# Altium PCB 400390.PcbDoc (part 4 of 5)
Units mm, origin at the board's own origin, x right, y up, seen from the top; angles counter-clockwise.
Board outline 50.8 x 50.4 mm, 4 copper layers (Top Layer, Mid Layer 1, Mid Layer 2, Bottom Layer), stack 1.507 mm thick; 262 components, 210 nets, 1216 pads, 1075 vias.
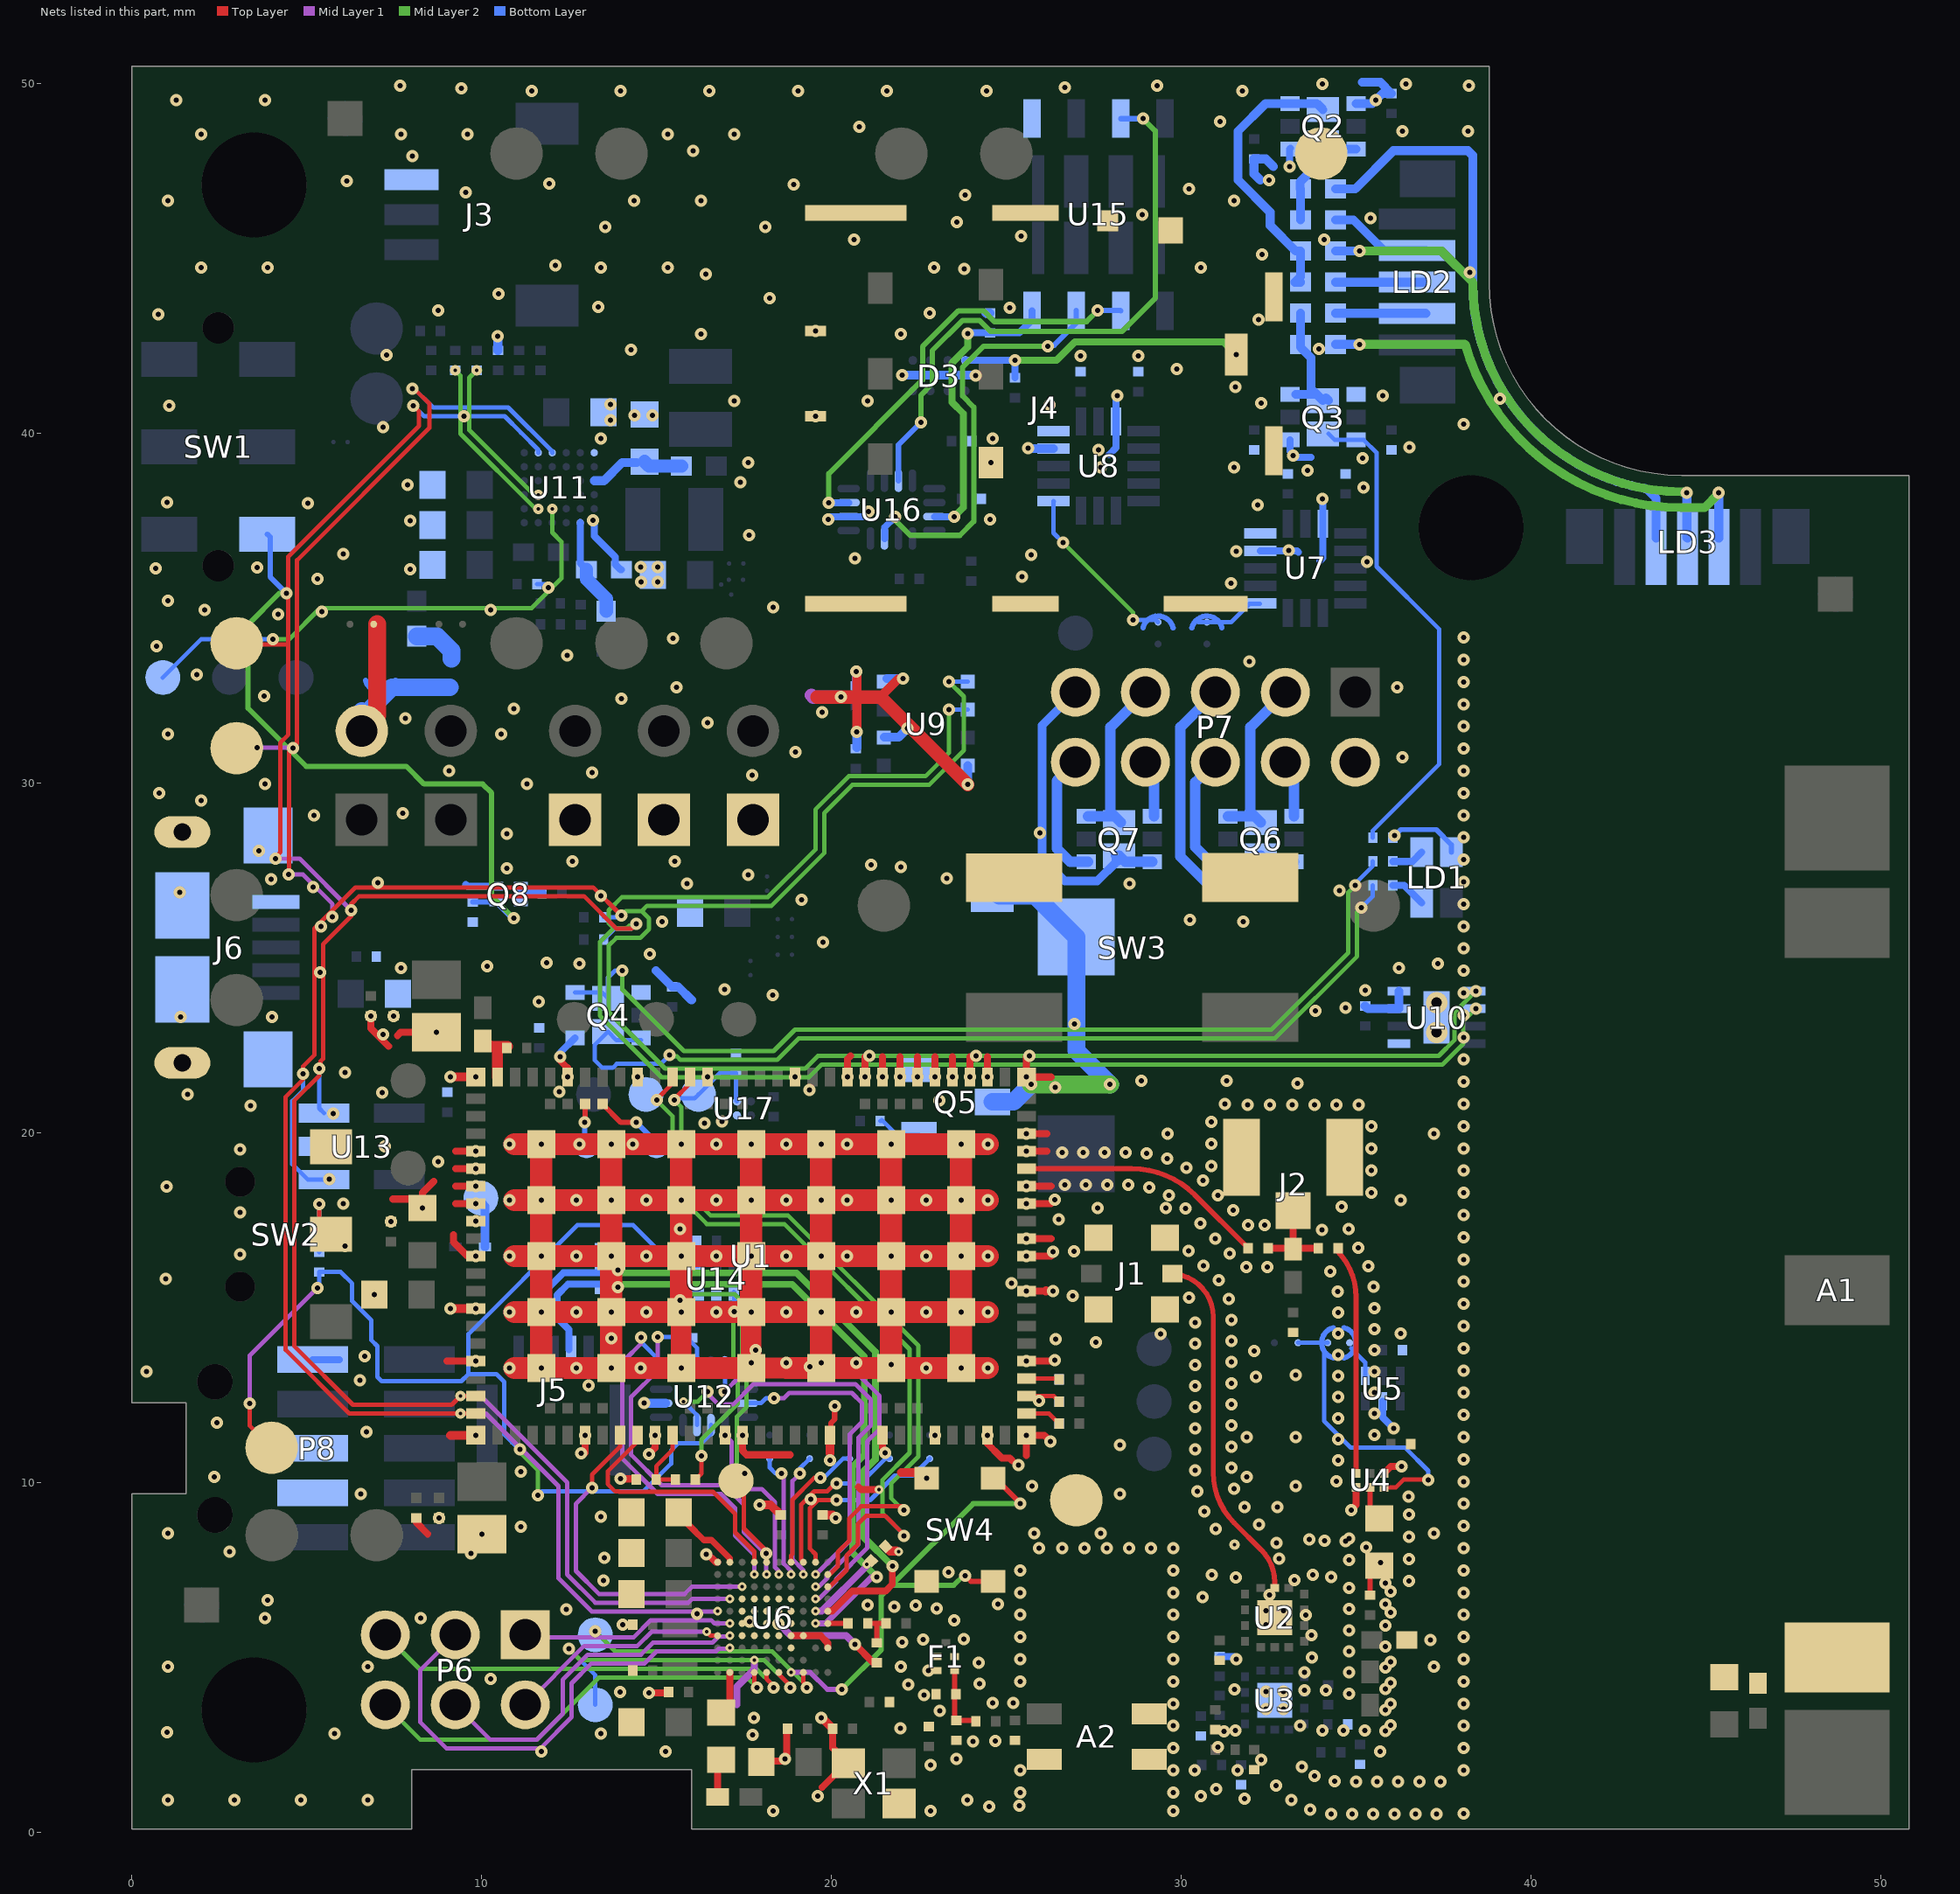
[diagram p5: the nets of this part, all layers, seen from the top]

## Via types
v1: diameter 0.35, hole 0.15, Top Layer to Bottom Layer, tented both sides, 535 vias
v2: diameter 0.35, hole 0.15, Top Layer to Mid Layer 1, tented both sides, 229 vias
v3: diameter 0.35, hole 0.15, Mid Layer 2 to Bottom Layer, tented both sides, 195 vias
v4: diameter 0.35, hole 0.15, Top Layer to Mid Layer 1, tented top, 48 vias
v5: diameter 0.25, hole 0.1, Top Layer to Mid Layer 1, tented both sides, 35 vias
v6: diameter 0.3, hole 0.1, Mid Layer 2 to Bottom Layer, tented both sides, 26 vias
v7: diameter 0.3, hole 0.1, Top Layer to Mid Layer 1, tented both sides, 3 vias
v8: diameter 0.25, hole 0.1, Mid Layer 2 to Bottom Layer, tented both sides, 2 vias
v9: diameter 0.61, hole 0.305, Top Layer to Bottom Layer, tented both sides, 2 vias

## Nets (pads, with @x,y where several pads share a name; then routed paths per layer and width w, separated by ;. In a path a pad name is that pad's centre, name@x,y a point inside that pad or via, vN(x,y) a via of type N, cw(c..) or ccw(c..) an arc to the next point about the centre after c; other vN are vias at no path point) (continued)
GND: A2.2 C1.2 C2.2 C3.2 C4.2 C6.1 C7.2 C8.1 C12.1 C13.1 C14.1 C16.1 C17.1 C18.2 C19.2 C20.1 C21.2 C22.2 C23.2 C24.2 C25.2 C26.2 C27.2 C28.1 C29.2 C30.2 C31.2 C32.2 C33.2 C34.1 C35.2 C36.1 C37.1 C38.1 C39.1 C40.1 C41.1 C42.1 C43.2 C44.2 C45.1 C46.1 C47.1 C48.1 C49.1 C50.1 C51.1 C53.1 C54.2 C55.2 C56.2 C57.1 C58.2 C59.1 C60.1 C63.2 C64.2 C65.2 C66.2 C67.2 C68.2 CR1.1 D3.B1 D3.B2 F1.2 F1.3 F1.5 J1.2 J2.2 J3.1 J4.0 J4.C5 J4.CSW J6.5 J6.6@1.45,22 J6.6@1.45,24.1 J6.6@1.45,26.5 J6.6@1.45,28.6 J6.6@3.9,22.1 J6.6@3.9,28.5 L4.1 L5.1 L6.1 L7.1 L15.2 P3.1 P4.1 P5.1 P7.2 P8.3 P8.5 P8.9 Q2.1 Q2.4 Q3.1 Q3.4 Q4.1 Q4.4 Q5.2 Q8.2 R4.1 R5.1 R6.1 R32.1 R40.2 R41.1 R42.1 R43.1 R44.1 R45.1 R46.1 R48.2 R50.1 ST11.2 SW2.1 SW3.1 SW4.1 TP15.1 TP16.1 U1.1 U1.5 U1.6 U1.7 U1.8 U1.9 U1.11 U1.14 U1.17 U1.21 U1.27 U1.31 U1.36 U1.41 U1.44 U1.47 U1.50 U1.52 U1.56 U1.60 U1.62 U1.63 U1.65 U1.66 U1.68 U1.69 U1.72 U1.74 U1.75 U1.76 U1.77 U1.78 U1.79 U1.80 U1.81 U1.82 U1.85 U1.90 U1.94 U1.98 U1.103 U2.15 U3.15 U4.1 U4.4 U5.2 U6.B7 U6.C1 U6.C4 U6.D3 U6.D4 U6.D5 U6.D6 U6.D7 U6.D8 U6.E4 U6.E5 U6.E6 U6.E7 U6.E8 U6.F4 U6.F5 U6.F6 U6.F7 U6.F8 U6.G4 U6.G5 U6.G6 U6.G7 U6.G8 U6.K10 U7.12 U7.13 U7.16 U8.12 U8.13 U8.16 U9.1 U9.5 U9.7 U10.1 U10.3 U10.4 U10.9 U11.A1 U11.F1 U12.6 U13.2 U14.5 U15.1 U16.6 U17.B1 X1.2 X1.4 | length 193.9
  Top Layer w0.152: U1.41@19.956,11.357 19.98,11.381 19.98,11.701 20.091,11.812 v1(20.091,12.192)
  Top Layer w0.2: 9.255,17.977 v2(9.836,17.977) ; 9.255,18.477 v2(9.836,18.477) ; 9.255,18.977 v2(9.836,18.977) ; 9.255,19.477 v2(9.836,19.477) ; v1@12.217,22.098 12.456,21.859 v2(12.456,21.597) ; v1@12.956,10.848 v2(12.956,11.357) ; v1@14.732,3.988 15.315,3.988 C21.2@15.345,4.017 ; v1(14.783,10.82) 14.956,10.994 v2(14.956,11.357) ; C28.1@17.927,1.985 C28.1@18.054,1.858 ; C28.1@18.003,2.011 18.038,2.046 18.561,2.046 18.729,2.214 C29.2@18.729,2.975 ; U6.D4@18.847,5.626 19.635,5.626 19.638,5.622 19.692,5.622 19.897,5.417 U6.C1@19.897,5.276 ; 19.736,1.295 19.739,1.295 20.091,1.647 20.159,1.647 X1.2@20.484,1.972 20.434,1.972 20.109,2.297 20.109,2.347 20.035,2.421 C19.2@20.035,2.97 ; v2(20.456,21.597) 20.456,22.11 20.549,22.203 ; v1(20.669,5.382) 21.198,4.853 C20.1@21.301,4.853 ; v2(20.956,21.597) v2@20.956,22.178 ; v2(21.456,21.597) 21.456,22.178 ; v2(21.956,21.597) 21.956,22.178 ; v2(22.456,21.597) 22.456,22.178 ; v2(22.956,21.597) 22.956,22.178 ; v2(23.456,21.597) 23.456,22.178 ; v2(23.956,21.597) 23.956,22.178 ; v2(24.456,11.357) 24.456,11.119 24.581,10.994 24.713,10.862 24.875,10.7 25.1,10.7 25.175,10.625 ; v2(24.456,21.597) 24.456,22.178 ; 25.576,10.776 v2(25.576,11.357) 26.083,11.357 v1(26.264,11.176) ; v2(25.576,19.477) 26.157,19.477 ; v2(25.576,19.977) 26.157,19.977 ; v2(25.576,21.597) v2@25.576,22.178
  Top Layer w0.203: v2(6.831,23.344) 6.831,22.989 7.341,22.479 ; 7.468,18.11 8.048,18.11 v2(8.306,17.852) 8.306,18.288 8.636,18.618 ; 7.595,22.784 7.688,22.877 v2(8.706,22.877) ; C65.2@8.131,8.992 8.131,8.862 8.458,8.534 ; 9.007,13.477 v2(9.836,13.477) ; 9.195,17.094 9.195,16.878 9.596,16.477 v2(9.836,16.477) ; v2(13.97,10.109) C68.2@14.396,10.109 ; U1.31@14.908,11.309 v2(14.956,11.357) ; v1@16.417,8.005 16.696,7.726 U6.K10@16.747,7.726 ; U1.36@17.456,11.357 v2(17.458,11.355) 17.458,10.914 17.577,10.795 18.821,10.795 ; 20.774,9.881 20.85,9.804 v5(21.361,9.804) ; 21.456,11.008 U1.44@21.456,11.357 ; v2(25.576,13.477) v1@26.28,13.477 ; v2(25.576,15.477) 26.13,15.477 v2@26.28,15.477 ; v2(25.576,16.477) v2@26.28,16.477 ; v2(25.576,16.977) 26.28,16.977 ; v2(25.576,17.977) v2@26.28,17.977 ; v2(25.576,18.477) 26.28,18.477 ; v2(25.576,21.597) 26.28,21.597 ; v1(34.855,9.217) 35,9.362 U4.4@35,9.87 ; U4.1@35.8,10.27 35.992,10.462 v1(36.303,10.462)
  Top Layer w0.25: 9.106,11.357 v2(9.836,11.357) ; v1(9.106,14.979) U1.14@9.836,14.979 ; v1(9.106,21.599) v2(9.836,21.597)
  Top Layer w0.254: v1(17.949,9.367) 18.261,9.367 C23.2@18.55,9.078 ; v1(19.71,3.277) 19.728,3.277 C19.2@20.035,2.97 ; C24.2@19.745,9.078 20.031,9.078 v1(20.117,8.992) ; 19.956,10.837 U1.41@19.956,11.357 ; v1(20.727,31.465) 20.727,32.309 ; 20.727,32.461 v1@20.727,33.242 ; 21.394,32.461 21.903,32.97 22.03,32.97 v1(22.048,32.988) ; C25.2@21.558,8.175 C25.2@21.547,8.175 21.675,8.047 v5@21.855,8.047 ; 21.996,10.287 22.565,10.287 v2(22.723,10.129) ; 26.13,15.477 26.139,15.486
  Top Layer w0.381: 19.583,32.461 v1(20.269,32.461) 20.727,32.461 21.394,32.461 v1(23.895,29.96)
  Top Layer w0.508: v2(13.706,19.677) U1.103@13.824,19.677 ; v2(15.706,19.677) U1.103@15.706,19.712
  Top Layer w0.584: v2(15.706,13.277) v2(15.706,14.877) ; U1.103@17.706,13.277 v2(17.706,14.877)
  Top Layer w0.597: U1.103@17.706,13.277 v2@18.706,13.277
  Top Layer w0.635: v2@10.944,13.277 v2(11.706,13.277) ; v1@10.944,14.877 v2(11.706,14.877) ; v1@10.944,16.477 v2(11.706,16.477) ; v1@10.944,18.077 v2(11.706,18.077) ; v1@10.944,19.677 v2(11.706,19.677) ; U1.103@17.706,13.277 v2(15.706,13.277) v2(13.706,13.277) ; v2@18.706,13.277 U1.103@19.706,13.277 ; v1(24.468,13.277) v2(23.706,13.277) ; v2(24.468,14.877) v2(23.706,14.877) ; v2(24.468,16.477) v2(23.706,16.477) ; v1(24.468,18.077) v2(23.706,18.077) ; v1(24.468,19.677) v2(23.706,19.677) ; v2(11.706,13.277) v2(11.706,14.877) ; v2(11.706,13.277) v2(12.706,13.277) v2(13.706,13.277) ; v2(11.706,14.877) v2(11.706,16.477) ; v2(11.706,14.877) v1(12.706,14.877) v2(13.706,14.877) ; v2(11.706,16.477) v2(11.706,18.077) ; v2(11.706,16.477) v1(12.706,16.477) v2(13.706,16.477) ; v2(11.706,18.077) v1(12.706,18.077) v2(13.706,18.077) ; v2(11.706,18.077) v2(11.706,19.677) ; v2(11.706,19.677) v2(13.706,19.677) ; v2(13.706,13.277) v2(13.706,14.877) ; v2(13.706,14.877) v2(13.706,16.477) ; v2(13.706,14.877) v2(14.706,14.877) v2(15.706,14.877) ; v2(13.706,16.477) v2(13.706,18.077) ; v2(13.706,16.477) v1(14.706,16.477) v2(15.706,16.477) ; v2(13.706,18.077) v1(14.706,18.077) v2(15.706,18.077) ; v2(13.706,18.077) v2(13.706,19.677) ; v2(13.706,19.677) v2(15.706,19.677) ; v2(15.706,14.877) v2(15.706,16.477) ; v2(15.706,14.877) v1(16.706,14.877) v2(17.706,14.877) ; v2(15.706,16.477) v2(15.706,18.077) ; v2(15.706,16.477) v2(16.706,16.477) v2(17.706,16.477) ; v2(15.706,18.077) v2(15.706,19.677) ; v2(15.706,18.077) v1(16.706,18.077) v2(17.706,18.077) ; v2(15.706,19.677) v1(16.706,19.677) v2(17.706,19.677) ; v2(17.706,14.877) v2(17.706,16.477) ; v2(17.706,14.877) v1(18.706,14.877) v2(19.706,14.877) ; v2(17.706,16.477) v2(17.706,18.077) ; v2(17.706,16.477) v1(18.706,16.477) v2(19.706,16.477) ; v2(17.706,18.077) v1(18.706,18.077) v2(19.706,18.077) ; v2(17.706,18.077) v2(17.706,19.677) ; v2(17.706,19.677) v2(18.706,19.677) v2(19.706,19.677) ; U1.103@19.706,13.277 U1.103@21.706,13.277 ; U1.103@19.706,13.277 v2(19.706,14.877) ; v2(19.706,14.877) v2(19.706,16.477) ; v2(19.706,14.877) v2(20.706,14.877) v2(21.706,14.877) ; v2(19.706,16.477) v2(19.706,18.077) ; v2(19.706,16.477) v1(20.452,16.477) v2(21.706,16.477) ; v2(19.706,18.077) v1(20.452,18.077) v2(21.706,18.077) ; v2(19.706,18.077) v2(19.706,19.677) ; v2(19.706,19.677) v1(20.452,19.677) v2(21.706,19.677) ; U1.103@21.706,13.277 v2(22.706,13.277) v2(23.706,13.277) ; U1.103@21.706,13.277 v2(21.706,14.877) ; v2(21.706,14.877) v2(21.706,16.477) ; v2(21.706,14.877) v2(22.706,14.877) v2(23.706,14.877) ; v2(21.706,16.477) v2(21.706,18.077) ; v2(21.706,16.477) v2(22.706,16.477) v2(23.706,16.477) ; v2(21.706,18.077) v1(22.706,18.077) v2(23.706,18.077) ; v2(21.706,18.077) v2(21.706,19.677) ; v2(21.706,19.677) v2(23.706,19.677) ; v2(23.706,13.277) v2(23.706,14.877) ; v2(23.706,14.877) v2(23.706,16.477) ; v2(23.706,16.477) v2(23.706,18.077) ; v2(23.706,18.077) v2(23.706,19.677)
  Mid Layer 1 w0.2: 17.297,3.658 17.297,4.166 17.797,4.665 v5(17.797,4.926) ; v1(18.491,5.969) 18.834,5.626 20.422,5.626 v1@20.572,5.476
  Mid Layer 1 w0.381: 19.431,32.512 19.482,32.461 v1(20.269,32.461)
  Bottom Layer w0.2: P8.9@5.175,13.52 P8.9@5.936,13.52 ; 9.55,27.1 9.603,27.047 Q8.2@10.42,27.047 ; v1(12.243,22.174) 12.243,22.291 Q4.4@12.669,22.718 ; v1(19.914,37.541) 19.993,37.621 U16.6@20.492,37.621 20.907,37.621 v1(21.057,37.77) ; 27.94,39.395 28.135,39.591 v3@28.135,41.097 ; U7.12@32.266,36.644 33.307,36.644 33.35,36.601 ; v1(33.096,47.625) 33.096,48.133 Q2.1@33.122,48.158 ; Q3.1@33.106,39.812 33.106,39.487 33.274,39.319 33.706,39.319 ; 33.96,36.347 34.053,36.441 v3@34.053,38.1
  Bottom Layer w0.203: U11.F1@13.221,37.446 13.221,37.065 13.825,36.46 13.825,36.249 13.968,36.106 C47.1@14.001,36.106 ; C17.1@31.096,5.032 31.497,5.032 v1(31.579,4.95) ; U5.2@35.758,12.326 35.758,11.867 v3(36.068,11.557)
  Bottom Layer w0.254: v1(10.465,42.774) 10.468,42.77 R32.1@10.468,42.369 ; v1@14.78,12.271 U12.6@15.26,12.271 ; 14.986,24.638 R45.1@15.448,24.176 15.625,24.176 16.002,23.799 ; C40.1@20.708,32.793 v1@20.708,33.242 ; C41.1@20.727,31.012 v1(20.727,31.465) ; U9.7@21.512,31.312 21.921,31.312 v1(22.175,31.566) ; U9.5@21.588,32.988 v1(22.048,32.988) ; v3(22.028,41.663) 24.116,41.663 v3(24.128,41.651) ; v1(23.895,29.96) U9.1@23.895,30.495 ; C59.1@24.415,43.44 C59.1@24.536,43.44 ; v3(25.629,39.573) 25.637,39.565 U8.12@26.348,39.565 ; 32.258,47.244 32.08,47.422 R42.1@32.08,47.848 32.416,47.848 32.639,47.625 ; Q2.4@34.996,49.431 35.461,49.431 v1(35.56,49.53) 35.746,49.716 R41.1@36.012,49.716 35.69,50.038 35.179,50.038 ; C42.1@35.255,23.628 35.333,23.55 U10.3@36.225,23.55 U10.4@36.225,24.05
  other v1: 34.28,0.532 34.884,0.53 35.488,0.53 36.092,0.53 36.696,0.53 37.3,0.53 38.075,0.536 18.339,0.61 22.835,0.61 29.775,0.612 33.688,0.651 24.511,0.737 25.375,0.759 1.031,0.927 2.936,0.927 4.841,0.927 6.746,0.927 23.891,0.927 33.148,0.923 19.609,1.041 25.4,1.143 29.775,1.143 32.71,1.338 34.39,1.461 34.994,1.458 35.598,1.458 36.202,1.458 36.806,1.458 37.41,1.458 33.807,1.62 25.4,1.778 29.775,1.778 38.075,1.778 33.45,1.875 22.835,1.93 18.669,2.108 23.574,2.108 15.265,2.311 29.775,2.413 38.075,2.413 24.05,2.6 24.691,2.616 17.753,2.788 5.793,2.832 13.413,2.832 1.016,2.87 21.971,2.972 29.775,3.048 38.075,3.048 17.789,3.281 23.1,3.475 32.421,3.531 32.921,3.531 29.775,3.683 38.075,3.683 24.615,3.708 25.199,3.708 22.65,3.925 14.783,3.988 34.802,3.97 13.964,4.015 32.421,4.031 32.921,4.031 22.197,4.226 24.232,4.253 25.4,4.318 29.775,4.318 38.075,4.318 34.802,4.574 22.775,4.625 1.031,4.737 6.746,4.737 21.986,4.737 37.226,4.737 24.211,4.856 25.4,4.953 29.775,4.953 38.075,4.953 34.802,5.178 22.02,5.438 22.62,5.509 23.788,5.524 25.4,5.588 29.775,5.588 38.075,5.588 34.802,5.782 14.041,5.944 32.421,5.944 32.921,5.944 17.655,6.023 23.515,6.063 3.81,6.121 8.255,6.121 25.4,6.223 29.775,6.223 38.075,6.223 32.421,6.344 32.921,6.344 12.421,6.375 23.013,6.399 34.802,6.386 21.801,6.453 21.031,6.502 22.415,6.485 24.765,6.528 3.888,6.642 25.4,6.858 29.775,6.858 38.075,6.858 34.802,6.99 13.489,7.199 30.868,7.363 23.343,7.442 25.4,7.493 29.775,7.493 38.075,7.493 16.417,7.955 2.794,8.026 25.94,8.128 26.6,8.128 27.235,8.128 27.87,8.128 28.505,8.128 29.14,8.128 29.775,8.128 38.075,8.128 1.031,8.547 25.796,8.547 27.701,8.547 37.226,8.547 11.125,8.738 38.075,8.763 13.413,9.028 38.075,9.398 6.553,9.677 28.245,9.677 25.73,9.906 33.274,9.906 38.075,10.033 2.362,10.16 31.877,10.16 11.125,10.312 25.35,10.5 38.075,10.668 12.852,10.846 28.245,11.074 31.877,11.303 33.274,11.303 38.075,11.303 6.706,11.455 2.438,11.709 38.075,11.938 14.653,12.271 38.075,12.573 32.131,13.03 33.274,13.081 0.425,13.175 38.075,13.208 14.554,13.277 26.389,13.502 6.655,13.614 32.08,13.767 38.075,13.843 27.559,14.021 26.416,14.097 13.706,14.127 36.273,14.262 38.075,14.478 10.792,14.877 38.075,15.113 38.075,15.748 0.975,15.825 38.075,16.383 10.792,16.477 3.1,16.525 38.075,17.018 15.672,17.247 38.075,17.653 3.1,17.725 27.61,17.856 29.566,17.856 34.582,17.894 6.05,17.975 10.792,18.077 36.273,18.072 35.433,18.288 38.075,18.288 1,18.466 35.433,18.923 38.075,18.923 30.861,19.05 8.763,19.177 3.1,19.525 35.433,19.558 38.075,19.558 7.239,19.609 10.792,19.677 14.325,19.677 30.861,19.685 29.606,19.977 37.226,19.977 35.433,20.193 38.075,20.193 30.861,20.32 16.875,20.325 3.4,20.775 31.9,20.8 32.535,20.8 33.17,20.8 33.805,20.8 34.44,20.8 35.075,20.8 31.242,20.828 38.075,20.828 23.089,20.93 1.6,21.1 7.163,21.158 33.325,21.412 38.075,21.463 28.854,21.488 31.293,21.488 6.1,21.725 7.188,22.809 34.696,23.571 11.633,23.749 16.942,24.105 7.696,24.714 10.16,24.765 37.338,24.841 11.862,24.867 15.164,26.035 31.775,26.035 30.251,26.086 19.152,26.67 28.524,27.127 3.988,27.254 23.292,27.28 17.628,27.381 21.986,27.597 21.133,27.661 10.719,28.55 38.075,29.083 1.983,29.502 0.787,29.718 38.075,29.718 3.81,29.972 11.303,29.972 17.729,30.226 13.157,30.302 9.068,30.353 38.075,30.353 38.075,30.988 1.031,31.407 10.556,31.407 38.075,31.623 16.459,31.725 38.075,32.258 13.995,32.41 3.785,32.487 15.57,32.741 36.17,32.741 38.075,32.893 1.854,33.096 20.708,33.191 31.953,33.477 38.075,33.528 0.711,33.909 38.075,34.163 2.083,34.95 1.031,35.217 31.42,35.712 14.554,35.75 15.037,35.75 7.964,36.109 0.686,36.144 3.581,36.17 14.553,36.182 15.037,36.182 20.676,36.424 25.705,36.525 31.572,36.627 33.071,36.652 7.964,37.506 24.536,37.541 32.182,37.948 1.016,38.024 35.204,38.456 7.888,38.522 24.564,39.168 35.179,39.294 36.525,39.599 13.411,39.853 38.075,40.259 13.689,40.375 14.376,40.513 14.884,40.513 19.544,40.488 1.067,40.792 13.689,40.832 17.223,40.932 35.763,41.072 16.271,42.837 19.544,42.928 0.762,43.409 8.763,43.51 18.237,43.866 10.49,43.993 16.408,44.552 1.983,44.742 3.888,44.742 13.413,44.742 15.318,44.742 30.558,44.742 12.116,44.806 32.309,45.11 20.65,45.542 25.425,45.644 13.538,45.898 18.11,45.898 23.582,46.041 1.031,46.647 14.366,46.647 16.271,46.647 31.511,46.647 23.825,46.812 9.55,46.888 30.226,46.99 18.923,47.117 6.147,47.219 32.512,47.244 8.026,47.93 16.053,48.082 1.983,48.552 7.698,48.552 9.603,48.552 15.318,48.552 17.223,48.552 36.322,48.641 38.202,48.641 20.803,48.768 31.115,48.92 1.27,49.53 3.81,49.53 11.43,49.784 13.97,49.784 16.51,49.784 19.05,49.784 21.59,49.784 24.43,49.784 31.75,49.784 9.423,49.86 26.67,49.886 7.671,49.936 29.312,49.936 38.227,49.936 34.036,49.987 36.424,49.987
  other v2: 30.995,1.241 30.385,1.775 31.604,1.775 31.553,2.918 34.036,2.921 34.64,2.921 35.244,2.921 33.401,3.048 35.979,3.07 35.979,3.674 33.528,4.064 34.132,4.064 31.528,4.089 35.979,4.278 10.262,4.396 33.528,4.572 35.979,4.882 37.125,5.5 35.979,6.29 30.614,6.728 35.979,6.894 36.506,7.185 31.559,7.287 34.802,7.794 36.506,7.82 13.513,7.849 32.725,8.275 33.655,8.382 34.802,8.398 36.506,8.455 10.006,8.525 32.225,8.8 8.781,8.99 36.506,9.09 32.75,9.3 36.5,9.6 19.964,10.643 21.532,10.849 22.956,11.357 10.792,13.277 21.706,13.379 17.706,13.429 18.706,13.429 19.706,13.429 20.706,13.429 29.413,14.249 9.836,14.977 30.226,15.291 26.899,15.342 6.931,15.377 26.338,15.477 31.856,16.162 32.46,16.162 31.391,16.547 26.338,16.604 26.933,16.612 30.971,16.982 31.91,17.364 32.387,17.364 30.544,17.409 7.406,17.462 9.836,17.477 26.492,17.526 31.483,17.791 30.117,17.836 26.389,18.096 29.645,18.213 31.054,18.216 29.087,18.444 26.674,18.51 27.278,18.51 27.882,18.51 28.486,18.51 30.627,18.643 5.65,18.675 30.144,19.006 29.599,19.266 29.012,19.411 26.597,19.444 27.201,19.444 27.805,19.444 28.409,19.444 12.8,19.677 5.766,20.549 26.393,21.303 14.456,21.597 16.456,21.597 18.956,21.597 38.075,22.098 21.082,22.203 24.13,22.203 25.654,22.203 38.075,22.733 26.949,23.114 1.397,23.317 7.481,23.344 38.075,23.368 33.833,23.495 38.075,24.003 38.075,24.638 38.075,25.273 19.761,25.451 38.075,25.908 38.075,26.543 1.372,26.873 34.528,26.924 38.075,27.178 38.075,27.813 3.632,28.067 38.075,28.448 36.095,28.5 25.959,28.575 5.207,29.083 7.747,29.134 36.322,30.734 18.974,30.886 19.736,32.029 12.446,33.655 15.469,34.138 5.436,34.9 10.262,34.95 18.339,35.027 25.451,35.898 35.306,36.322 6.045,36.551 13.183,37.516 5.029,37.998 17.399,38.608 7.188,40.183 9.5,40.488 32.283,40.869 39.116,40.996 7.29,42.24 33.934,42.418 38.252,44.602 34.087,45.542 35.408,46.152 28.88,46.253
  other v3: 31.807,0.962 30.563,1.038 32.283,2.083 11.709,2.311 35.686,2.314 31.045,2.435 31.223,2.892 35.835,2.899 35.835,3.503 35.835,4.107 35.835,4.711 33.731,5.004 35.835,5.315 33.721,5.639 35.835,5.919 33.56,6.22 16.154,6.248 35.835,6.523 32.524,6.794 35.835,7.127 33.23,7.21 34.285,7.304 33.757,7.366 35.692,7.714 32.791,7.823 9.703,7.976 18.136,7.976 35.279,8.155 34.098,8.336 34.702,8.332 19.406,9.525 25.933,12.344 13.056,12.776 6.528,12.929 19.39,13.31 17.831,13.792 25.146,15.697 6.099,16.764 16.375,20.275 12.217,21.184 19.375,21.225 4.013,23.317 18.325,23.94 35.255,24.079 5.385,24.587 36.22,24.714 12.802,24.841 14.808,25.121 5.41,25.908 13.411,26.772 5.182,27.026 15.875,27.127 7.036,27.153 10.719,27.559 12.598,27.762 15.519,27.762 7.823,31.852 10.922,32.131 4.191,34.823 5.309,35.839 17.653,37.084 34.036,38.125 33.604,38.938 27.701,39.027 31.511,39.027 17.628,39.167 33.198,39.37 27.635,39.522 24.613,39.853 26.238,40.818 21.033,40.932 28.169,41.072 31.547,41.326 29.87,41.834 27.127,42.215 28.778,42.215 14.275,42.393 21.986,42.837 32.207,43.256 22.809,43.434 25.095,43.586 13.335,43.612 23.8,44.704 22.938,44.742 11.938,47.142
  other v4: 30.986,8.673 30.658,9.18 31.805,9.303 30.455,9.749 31.51,9.83 34.438,10.034 30.4,10.35 31.432,10.429 34.484,10.636 30.4,10.954 31.432,11.033 34.484,11.24 35.516,11.371 30.4,11.558 31.432,11.637 34.484,11.844 35.516,11.975 30.4,12.162 31.432,12.241 34.484,12.448 35.516,12.579 30.4,12.766 31.432,12.845 34.484,13.052 35.516,13.183 30.4,13.37 31.432,13.449 34.484,13.656 35.516,13.787 30.4,13.974 31.432,14.053 34.484,14.26 35.516,14.391 30.4,14.578 31.432,14.657 34.484,14.864 35.516,14.995 31.355,15.256 34.467,15.468 35.493,15.598 31.074,15.791 34.266,16.038 35.35,16.185 30.636,16.207 30.206,16.631 35.057,16.714 34.018,17.225 34.787,17.254
  other v5: 21.92,8.026
  other v7: 31.525,8.225
  other v9: 37.3,22.875 37.3,23.725
GPS_EN: SB12.2 SB13.2 U4.6 | length 8.1
  Top Layer w0.125: U4.6@35.8,9.87 36.138,9.87 36.356,10.088 v1@37.058,10.088
  Bottom Layer w0.125: SB12.2@33.338,14 34.013,14 SB13.2@34.188,14 ; 34.087,13.755 34.087,11.76 34.847,11 36.4,11 37.061,10.339 37.061,10.085 v1(37.065,10.081) ; v1@37.031,10.046 v1@37.065,10.012
GPS_LNA_IN: L1.1 U4.5 | length 0.8
  Top Layer w0.146: L1.1@35.4,9.033 U4.5@35.4,9.87
GPS_RF1: C61.2 U4.3 | length 6.6
  Top Layer w0.146: C61.2@34.445,16.64 cw(c33.105,15.3) 35,15.3 U4.3@35,10.258 ; C61.2@34.485,16.7 C61.2@34.545,16.64
GPS_RF2: C61.1 C62.2 J2.1 L2.2 | length 2.5
  Top Layer w0.203: C62.2@32.483,16.7 C61.1@33.915,16.7 ; L2.2@33.2,16.675 33.2,16.7 J2.1@33.2,17.775
GPS_RF3: C62.1 U1.67 | length 7.2
  Top Layer w0.146: U1.67@25.576,18.977 28.584,18.977 cw(c28.584,16.437) 30.38,18.233 C62.1@31.913,16.7
ICS: R37.1 U11.E5 | length 5
  Mid Layer 2 w0.125: v6(9.249,41.799) 9.398,41.65 9.398,39.991 11.543,37.846 v6(11.621,37.846)
ILIM: R36.1 U11.D5 | length 4.6
  Mid Layer 2 w0.125: v6(9.858,41.799) 9.648,41.588 9.648,40.095 11.497,38.246 v6(11.621,38.246) ; v6@9.909,41.748 v6@9.96,41.799
LTE_RF: J1.3 U2.13 | length 10.3
  Top Layer w0.146: J1.3@29.676,15.977 cw(c29.676,14.737) 30.916,14.737 30.916,10.288 ccw(c32.944,10.288) 31.51,8.854 32.29,8.074 cw(c31.37,7.154) 32.671,7.154 U2.13@32.671,6.989
LW_BLUE: Q3.3 R17.1 R20.1 | length 3.5
  Bottom Layer w0.254: Q3.3@33.269,41.112 Q3.3@33.876,41.112 ; R17.1@33.409,43.434 R20.1@33.409,42.545 33.409,42.461 33.711,42.159 33.711,41.278 Q3.3@33.876,41.112 ; Q3.3@34.051,40.937 Q3.3@33.876,41.112 ; Q3.3@34.132,41.019 Q3.3@34.214,40.937
LW_GREEN: Q2.6 R16.1 R19.1 | length 3.1
  Bottom Layer w0.254: R16.1@33.409,46.101 R19.1@33.409,46.99 33.401,46.998 33.401,47.193 34.339,48.131 Q2.6@34.996,48.131
LW_RED: Q2.3 R15.1 R18.1 | length 8.2
  Bottom Layer w0.254: R15.1@33.409,44.323 33.249,44.323 33.409,44.483 R18.1@33.409,45.212 33.274,45.212 32.543,45.943 32.543,46.324 31.623,47.244 31.623,48.641 32.413,49.431 Q2.3@33.106,49.431 33.876,49.431 Q2.3@34.051,49.256
M\R\: R34.2 TP24.1 U11.E4 | length 15
  Mid Layer 2 w0.125: v3(4.039,34.112) 4.496,34.112 5.385,35.001 11.43,35.001 12.283,35.854 12.283,36.903 12.021,37.165 v6(12.021,37.846)
  Bottom Layer w0.125: TP24.1@0.889,33.02 1.981,34.112 v3(4.039,34.112) ; R34.2@11.588,35.687 11.811,35.687 v3(11.913,35.585)
MFF_1V8: C59.2 U15.8 U16.15 | length 8.5
  Mid Layer 2 w0.2: v3(23.51,37.621) 23.768,37.879 23.768,40.57 23.451,40.888 23.451,42.018 23.901,42.469 v3(23.901,42.85)
  Bottom Layer w0.2: U16.15@22.942,37.621 v3(23.51,37.621) ; v3(23.901,42.85) 23.927,42.875 25.375,42.875 25.73,43.231 U15.8@25.73,43.503
MFF_CLK: U15.6 U16.7 | length 12.5
  Mid Layer 2 w0.152: v3(19.924,38.021) 19.924,38.847 22.608,41.531 22.608,42.481 23.631,43.503 24.351,43.503 24.658,43.197 27.297,43.197 v3(27.61,43.51)
  Bottom Layer w0.152: v3(27.61,43.51) 28.263,43.51 U15.6@28.27,43.503
  Bottom Layer w0.2: v3(19.924,38.021) U16.7@20.492,38.021
MFF_IO: U15.3 U16.11 | length 17.3
  Mid Layer 2 w0.152: v3(22.555,40.31) 22.555,41.086 22.885,41.416 22.885,42.366 23.746,43.226 24.236,43.226 24.543,42.92 28.315,42.92 29.256,43.861 29.256,48.646 v3(28.905,48.997)
  Bottom Layer w0.152: U16.11@21.917,38.646 21.917,39.672 v3(22.555,40.31) ; U15.3@28.27,49.003 28.277,48.997 v3(28.905,48.997)
MFF_RST: U15.7 U16.3 | length 12.1
  Mid Layer 2 w0.152: v3(21.822,37.614) 21.822,37.52 22.258,37.084 23.673,37.084 24.069,37.48 24.069,40.752 23.752,41.069 23.752,41.893 24.353,42.494 v3(26.187,42.494)
  Bottom Layer w0.152: v3@26.187,42.52 26.365,42.52 26.993,43.148 U15.7@26.993,43.51
  Bottom Layer w0.2: U16.3@21.517,36.996 21.517,37.309 v3(21.822,37.614)
MOS_1_D: P7.3 Q6.6 | length 5
  Bottom Layer w0.3: Q6.6@31.33,29.05 31.975,29.05 Q6.6@32.1,29.05 ; Q6.6@32.275,28.875 Q6.6@32.1,29.05 ; P7.3@32.975,32.6 31.975,31.6 31.975,29.175 Q6.6@32.1,29.05
MOS_1_S: P7.4 Q6.1 | length 1.7
  Bottom Layer w0.3: P7.4@32.975,30.6 33.22,30.355 Q6.1@33.22,29.05
MOS_2_D: P7.5 Q6.3 | length 9.1
  Bottom Layer w0.3: P7.5@30.975,32.6 29.975,31.6 29.975,27.9 30.675,27.2 31.675,27.2 32.275,27.8 Q6.3@32.275,27.925 32.45,27.75 Q6.3@33.22,27.75
MOS_2_S: P7.6 Q6.4 | length 3.8
  Bottom Layer w0.3: P7.6@30.975,30.6 30.4,30.025 30.4,28.175 30.825,27.75 Q6.4@31.33,27.75
MOS_3_D: P7.7 Q7.6 | length 5
  Bottom Layer w0.3: Q7.6@27.33,29.05 27.975,29.05 Q7.6@28.1,29.05 ; Q7.6@28.275,28.875 Q7.6@28.1,29.05 ; P7.7@28.975,32.6 27.975,31.6 27.975,29.175 Q7.6@28.1,29.05
MOS_3_S: P7.8 Q7.1 | length 1.7
  Bottom Layer w0.3: P7.8@28.975,30.6 29.22,30.355 Q7.1@29.22,29.05
MOS_4_D: P7.9 Q7.3 | length 9.1
  Bottom Layer w0.249: 26.025,31.65 P7.9@26.975,32.6 ; 26.026,31.649 26.026,27.849 26.675,27.2 27.601,27.2 28.13,27.729 Q7.3@28.13,27.864
  Bottom Layer w0.27: Q7.3@28.12,27.925 Q7.3@28.225,27.925
  Bottom Layer w0.3: Q7.3@28.225,27.8 Q7.3@28.225,27.925 28.4,27.75 Q7.3@29.17,27.75
MOS_4_S: P7.10 Q7.4 | length 3.7
  Bottom Layer w0.3: P7.10@26.975,30.6 26.441,30.066 26.441,28.134 26.825,27.75 Q7.4@27.28,27.75 Q7.4@27.33,27.75
NetA1_2: A1.2 C15.2 L8.2
NetBz1_2: Bz1.2 D2.2 Q5.3 | length 10.9
  Mid Layer 2 w0.508: v3(25.705,21.387) v3(27.965,21.387)
  Bottom Layer w0.508: Q5.3@24.604,20.889 25.207,20.889 v3(25.705,21.387) ; D2.2@24.8,26.778 25.822,26.778 Bz1.2@27,25.6 27,22.352 v3(27.965,21.387)
NetC5_2: C5.2 L1.2 | length 0.8
  Top Layer w0.146: C5.2@35.395,6.785 35.395,7.57 L1.2@35.4,7.575
NetC20_2: C20.2 L9.2 L10.1 | length 1.1
  Top Layer w0.146: L9.2@21.046,5.976 21.313,5.976 L10.1@21.562,5.976 ; C20.2@21.301,5.423 21.301,5.963
  Top Layer w0.229: L10.1@21.562,5.976 L10.1@21.574,5.976
NetC25_1: C25.1 U6.F2 | length 2
  Mid Layer 1 w0.2: v5(19.547,6.326) 19.722,6.326 21.006,7.609 v5@21.006,7.62
  other v5: 21.006,7.671
NetC32_1: C32.1 U6.K9 | length 2.2
  Top Layer w0.178: C32.1@15.638,9.155 15.638,9.077 16.104,8.61 16.104,8.606 16.332,8.378 16.336,8.378 16.356,8.358 16.575,8.358 16.83,8.103 17.097,7.836 U6.K9@17.097,7.726
NetC47_2: C47.2 R25.1 U11.F2 | length 2.8
  Bottom Layer w0.203: U11.F2@12.821,37.446 12.821,36.286 C47.2@13.001,36.106
  Bottom Layer w0.381: C47.2@13.001,36.106 13.001,35.836 13.564,35.273 R25.1@13.564,34.917
NetC49_2: C49.2 R31.1 U11.C1 | length 2.5
  Bottom Layer w0.254: U11.C1@13.23,38.647 13.501,38.647 14.022,39.168 C49.2@14.427,39.168
  Bottom Layer w0.381: C49.2@14.659,39.193 14.787,39.065 R31.1@15.705,39.065 R31.1@15.723,39.065
NetC68_1: C68.1 R8.2 U1.32 | length 2
  Top Layer w0.125: U1.32@15.456,11.357 15.456,10.935 14.992,10.47 C68.1@14.992,10.084 R8.2@15.539,10.084
NetCR1_2: CR1.2 F1.4 L15.1 R11.1 | length 2
  Top Layer w0.146: F1.4@23.525,4.625 23.525,3.246 23.565,3.206 L15.1@23.574,3.206 24.096,3.206 cw(c24.096,3.175) R11.1@24.127,3.175
NetD1_1: D1.1 TP1.1 | length 1.3
  Bottom Layer w0.254: TP1.1@10.025,17.975 10.097,17.903 D1.1@10.097,16.739
NetD3_C4: D3.C4 J4.DSW R38.1 | length 8.6
  Mid Layer 2 w0.2: v3(25.248,42.088) 26.435,42.088 26.962,42.615 31.213,42.615 v1(31.569,42.258)
  Bottom Layer w0.2: D3.C4@23.828,42.086 23.83,42.088 v3(25.248,42.088) R38.1@25.248,41.589
NetFB1_2: FB1.2 R7.1 U1.102 | length 1.7
  Top Layer w0.305: FB1.2@10.045,22.683 10.045,22.608 10.143,22.511 10.218,22.511 10.256,22.472 10.454,22.472 ; U1.102@10.454,21.597 10.454,22.472 ; R7.1@10.751,22.472 10.454,22.472
NetL11_1: L11.1 L12.2 | length 1.2
  Top Layer w0.2: L12.2@16.749,1.02 16.749,1.973 L11.1@16.849,2.072 16.891,2.114 L11.1@16.891,2.159
NetL11_2: L11.2 U6.A9 | length 1.3
  Top Layer w0.2: L11.2@16.849,3.422 17.097,3.671 U6.A9@17.097,4.576
NetLD1_1: LD1.1 R12.2 | length 2.2
  Bottom Layer w0.146: R12.2@36.048,28.445 36.048,28.46 36.088,28.5 36.103,28.5 36.273,28.67 37.291,28.67 37.725,28.236 LD1.1@37.725,28.025
NetLD1_2: LD1.2 R13.2 | length 0.9
  Bottom Layer w0.203: R13.2@36.048,27.759 36.609,27.759 LD1.2@36.875,28.025
NetLD1_3: LD1.3 R14.2 | length 1
  Bottom Layer w0.203: R14.2@36.048,27.073 36.377,27.073 LD1.3@36.875,26.575
NetLD2_3: LD2.3 R16.2 | length 2.9
  Bottom Layer w0.254: R16.2@34.409,46.101 34.924,46.101 35.797,45.228 LD2.3@36.992,45.228
NetLD2_4: LD2.4 R15.2 | length 2.6
  Bottom Layer w0.254: R15.2@34.409,44.323 36.987,44.323 LD2.4@36.992,44.328
NetLD2_5: LD2.5 R17.2 | length 2.6
  Bottom Layer w0.254: R17.2@34.409,43.434 36.986,43.434 LD2.5@36.992,43.428
NetLD3_3: LD3.3 R19.2 | length 17.9
  Bottom Layer w0.254: R19.2@34.409,46.99 34.976,46.99 36.068,48.082 38.195,48.082 38.331,47.946 38.331,44.3 ccw(c44.3,44.3) 43.263,38.422 ; 43.308,38.406 43.575,38.139 LD3.3@43.575,37
NetLD3_4: LD3.4 R18.2 | length 15.1
  Mid Layer 2 w0.254: v3(35.103,45.212) 37.444,45.212 38.318,44.338 ; 38.331,44.3 ccw(c44.3,44.3) 44.3,38.331 44.375,38.331 44.426,38.28 v3@44.452,38.28
  Bottom Layer w0.254: R18.2@34.409,45.212 v3(35.103,45.212) ; v3@44.452,38.28 44.452,37.023 LD3.4@44.475,37
  other v3: 44.452,38.305
NetLD3_5: LD3.5 R20.2 | length 14.6
  Mid Layer 2 w0.254: v3(35.103,42.545) 38.1,42.545 ; 38.12,42.537 ccw(c44.3,44.3) 44.3,37.874 ; 44.3,37.878 44.962,37.878 v3@45.364,38.28 ; v3@45.326,38.318 v3@45.364,38.356
  Bottom Layer w0.254: R20.2@34.409,42.545 v3(35.103,42.545) ; v3@45.364,38.28 45.364,37.011 LD3.5@45.375,37
  other v3: 45.364,38.305
NetP1_2: P1.2 SB1.1 SB2.1 SB3.2 | length 6.7
  Top Layer w0.508: P1.2@6.579,31.496 7.02,31.937 7.02,34.544
  Bottom Layer w0.508: P1.2@6.579,31.496 P1.2@6.579,32.055 ; P1.2@6.579,31.877 7.442,32.741 SB1.1@9.093,32.741
NetQ3_6: Q3.6 R12.1 | length 14.1
  Bottom Layer w0.125: Q3.6@34.214,39.987 34.389,39.812 Q3.6@34.996,39.812 35.219,39.812 35.585,39.446 35.585,36.189 37.377,34.397 37.377,30.543 35.478,28.645 R12.1@35.478,28.445
NetQ4_3: Q4.3 R14.1 | length 27.5
  Mid Layer 2 w0.125: v3(15.375,22.227) 15.418,22.184 15.587,22.184 15.682,22.09 18.453,22.09 19.066,22.703 32.681,22.703 35.028,25.05 35.028,26.318 v3(35.154,26.443)
  Bottom Layer w0.125: Q4.3@14.559,22.65 13.858,22.65 Q4.3@13.614,22.893 13.239,22.518 13.239,22.075 13.452,21.863 13.752,21.863 13.865,21.975 15.123,21.975 v3(15.375,22.227) ; v3(35.154,26.443) 35.478,26.768 R14.1@35.478,27.073
NetQ4_6: Q4.6 R13.1 | length 28.2
  Mid Layer 2 w0.125: v3(14.021,24.638) 14.021,24.104 15.786,22.34 18.349,22.34 18.962,22.953 32.577,22.953 34.778,25.153 34.778,26.879 v3(34.976,27.076)
  Bottom Layer w0.125: Q4.6@12.669,24.018 13.439,24.018 Q4.6@13.614,23.843 13.614,24.435 13.818,24.638 v3(14.021,24.638) ; v3(34.976,27.076) 34.976,27.132 35.478,27.634 R13.1@35.478,27.759
NetQ5_1: Q5.1 R21.1 | length 1.3
  Bottom Layer w0.125: R21.1@21.392,20.345 R21.1@21.463,20.345 ; R21.1@21.438,20.371 R21.1@21.463,20.345 ; Q5.1@22.504,19.939 21.869,19.939 R21.1@21.463,20.345
NetQ8_1: Q8.1 R48.1 SW1.4 | length 18.9
  Mid Layer 2 w0.15: v3(4.42,35.433) 4.222,35.433 3.324,34.536 3.324,32.139 4.987,30.477 7.852,30.477 8.357,29.972 10.033,29.972 10.287,29.718 10.287,26.772 v3(10.922,26.137)
  Bottom Layer w0.15: SW1.4@3.875,37.12 3.956,37.039 3.956,35.896 v3(4.42,35.433) ; R48.1@9.754,26.599 10.418,26.599 Q8.1@10.42,26.597 10.88,26.137 v3(10.922,26.137)
NetQ8_3: Q8.3 R47.2 | length 0.6
  Bottom Layer w0.25: Q8.3@11.12,26.822 11.145,26.848 R47.2@11.729,26.848
NetR1_1: R1.1 U1.55 | length 0.9
  Top Layer w0.125: U1.55@25.576,12.977 26.489,12.977 R1.1@26.512,12.954
NetR2_1: R2.1 U1.54 | length 1
  Top Layer w0.125: U1.54@25.576,12.477 26.354,12.477 R2.1@26.512,12.319
NetR3_1: R3.1 U1.53 | length 1.1
  Top Layer w0.125: U1.53@25.576,11.977 26.219,11.977 R3.1@26.512,11.684
NetR24_1: R24.1 SB1.2 | length 1.4
  Bottom Layer w0.508: R24.1@8.153,34.196 8.73,34.196 9.144,33.782 9.144,33.553
NetR39_1: R39.1 SW2.2 | length 2.4
  Top Layer w0.125: v1(5.359,17.966) 5.359,17.441 SW2.2@5.7,17.1
  Bottom Layer w0.125: R39.1@5.359,16.592 v1(5.359,17.966)
NetR39_2: R39.2 TP28.1 U12.2 U14.1 | length 33.3
  Top Layer w0.125: v2(3.378,12.268) 3.378,11.622 TP28.1@4,11
  Mid Layer 1 w0.125: v2(3.378,12.268) 3.378,13.64 v1(5.309,15.57)
  Mid Layer 2 w0.125: v3(11.1,10.947) 11.1,10.871 11.608,10.363 v3(11.608,9.645)
  Bottom Layer w0.125: v1(5.309,15.57) 5.359,15.621 R39.2@5.359,16.022 5.975,16.022 6.303,15.693 6.303,15.189 6.851,14.641 6.851,14.074 7.022,13.902 7.022,13.024 7.143,12.903 9.423,12.903 9.627,13.106 ; v3@11.079,10.943 10.651,11.371 10.651,12.877 10.422,13.106 9.627,13.106 ; v3(11.608,9.645) 11.72,9.758 14.632,9.758 15.418,10.543 15.418,10.924 15.626,11.132 16.288,11.132 16.558,11.401 U12.2@16.558,11.646 ; U14.1@16.213,16.204 15.491,16.204 14.337,17.359 12.736,17.359 9.627,14.249 9.627,13.106
NetSB5_2: SB5.2 U7.9 | length 2
  Bottom Layer w0.125: 30.48,34.602 SB5.2@30.734,34.602 30.833,34.602 31.087,34.602 31.427,34.602 31.953,35.128 U7.9@32.25,35.128
NetSB6_2: SB6.2 U8.9 | length 5.1
  Mid Layer 2 w0.125: v3(26.619,36.881) 28.626,34.874 v3(28.626,34.671)
  Bottom Layer w0.125: U8.9@26.365,38.048 U8.9@26.348,38.065 26.348,37.152 v3(26.619,36.881) ; v3(28.626,34.671) 29.049,34.671 29.268,34.671 SB6.2@29.337,34.602
NetSB13_1: SB13.1 U5.4 | length 1
  Bottom Layer w0.125: 34.856,13.843 35.005,13.694 35.258,13.442 U5.4@35.258,13.051
NetTP5_1: TP5.1 U1.124 | length 2.1
  Top Layer w0.15: U1.124@13.456,20.827 13.983,20.3 v1(14.425,20.3)
  Bottom Layer w0.15: v1(14.425,20.3) 15,19.725 TP5.1@15,19.625
NetTP6_1: TP6.1 U1.125 | length 1.2
  Top Layer w0.15: v1(12.95,20.3) 12.956,20.306 U1.125@12.956,20.827
  Bottom Layer w0.15: v1(12.95,20.3) 12.95,19.675 TP6.1@13,19.625
nRF52_ANT: L9.1 U6.E1 | length 0.6
  Top Layer w0.146: U6.E1@19.897,5.976 L9.1@20.47,5.976
nRF52_P0.03: TP25.1 U6.A5 | length 9.3
  Top Layer w0.125: U6.A5@18.497,4.576 18.497,4.519 18.825,4.192 v1(18.825,4.145) v1@18.825,4.094
  Mid Layer 2 w0.125: v3(12.5,5.25) 12.822,4.928 18.079,4.928 18.825,4.182 v1(18.825,4.145)
  Bottom Layer w0.125: v3(12.5,5.25) 13.25,4.5 TP25.1@13.25,3.65
nRF52_P0.05: P6.2 U6.D10 | length 6.4
  Top Layer w0.125: v5(16.434,5.74) 16.548,5.626 U6.D10@16.747,5.626
  Mid Layer 1 w0.125: P6.2@11.25,3.65 12.931,5.331 14.454,5.331 14.863,5.74 v5(16.434,5.74)
nRF52_P0.06: P6.1 U6.E9 | length 6.2
  Mid Layer 1 w0.125: P6.1@11.25,5.75 11.419,5.581 14.35,5.581 14.837,6.068 16.563,6.068 16.655,5.976 v5(17.097,5.976)
nRF52_P0.09: C57.2 J5.4 U6.F1 | length 21.8
  Top Layer w0.195: U6.F1@19.897,6.326 20.017,6.326 20.594,6.902 21.552,6.902 21.742,7.092 v1(21.742,7.62)
  Mid Layer 2 w0.19: v3(13.894,16.073) 13.97,15.997 19.003,15.997 21.26,13.74 21.26,10.665 20.923,10.328 20.923,8.44 v1(21.742,7.62)
  Bottom Layer w0.2: J5.4@11.5,13.8 11.5,14.376 11.838,14.714 11.838,15.502 12.333,15.997 13.812,15.997 13.818,16.002 13.823,16.002 v3(13.894,16.073)
nRF52_P0.10: C56.1 J5.2 U6.E2 | length 20.6
  Mid Layer 1 w0.178: v5(19.547,5.976) 19.832,5.976 21.156,7.3 v1(21.3,7.3)
  Mid Layer 2 w0.19: v3(13.894,15.596) 13.97,15.672 18.883,15.672 20.945,13.61 20.945,10.795 20.608,10.458 20.608,7.992 v1(21.3,7.3)
  Bottom Layer w0.2: J5.2@12.5,13.8 12.5,14.376 12.162,14.714 12.162,15.367 12.467,15.672 13.818,15.672 v3(13.894,15.596)
nRF52_P0.11: U1.29 U6.H8 | length 9.5
  Top Layer w0.125: v2(13.157,9.855) 13.157,10.227 13.956,11.025 U1.29@13.956,11.357
  Mid Layer 1 w0.125: v2(13.157,9.855) 12.696,9.394 12.696,7.476 13.354,6.818 15.806,6.818 16.014,7.026 v5(17.447,7.026)
nRF52_P0.14: U6.J7 U12.8 | length 10.9
  Mid Layer 1 w0.125: v1(14.554,14.148) 14.554,13.97 14.097,13.513 14.097,13.03 14.018,12.952 14.018,10.696 15.037,9.677 16.842,9.677 17.246,9.274 17.246,8.486 17.448,8.284 17.579,8.153 17.797,7.935 v5(17.797,7.376)
  Bottom Layer w0.125: v1(14.554,14.148) 14.554,14.027 15.133,13.448 U12.8@15.133,13.071
nRF52_P0.15: U1.30 U6.K7 | length 7.4
  Top Layer w0.125: U1.30@14.456,11.357 14.456,11.172 13.607,10.323 13.607,9.959 13.82,9.747 13.926,9.747 13.93,9.743 16.611,9.743 17.246,9.107 17.246,8.578 17.797,8.027 U6.K7@17.797,7.726
nRF52_P0.17: R40.1 U6.J6 U12.10 | length 11.6
  Mid Layer 1 w0.125: v1(15.038,14.162) 15.038,13.209 14.268,12.44 14.268,10.808 15.149,9.927 16.946,9.927 17.496,9.377 17.496,8.59 18.136,7.95 18.136,7.439 18.11,7.414 v5(18.147,7.376)
  Bottom Layer w0.125: v1(15.038,14.162) 15.853,14.162 16.158,13.857 U12.10@16.158,13.296
nRF52_P0.19: SB10.1 U6.K4 | length 3.9
  Top Layer w0.125: U6.K4@18.847,7.726 18.847,7.921 18.888,7.961 18.888,9.515 19.507,10.135 v1(19.685,10.135)
  Bottom Layer w0.125: v1(19.685,10.135) 19.782,10.135 20.333,10.685 SB10.1@20.521,10.685
nRF52_P0.20: U1.35 U6.J5 | length 5
  Mid Layer 1 w0.125: v2(16.956,11.357) 17.149,11.164 17.149,10.078 17.407,9.819 18.009,9.819 18.388,9.441 18.388,7.578 18.497,7.468 v5(18.497,7.376)
nRF52_P0.21: SB7.1 U6.J4 | length 3.7
  Mid Layer 1 w0.125: v1(18.567,10.262) 18.638,10.191 18.638,7.681 18.847,7.471 v5(18.847,7.376)
  Bottom Layer w0.125: SB7.1@18.235,10.685 18.235,10.431 18.405,10.262 v1(18.567,10.262)
nRF52_P0.22: SB11.1 U6.K3 | length 4.7
  Top Layer w0.125: U6.K3@19.197,7.726 19.138,7.786 19.138,9.376 19.512,9.751 19.881,9.751 20.112,9.982 v1(20.142,9.982)
  Bottom Layer w0.125: v1(20.142,9.982) 20.834,9.982 21.537,10.685 SB11.1@21.664,10.685
nRF52_P0.25: SB9.1 U6.K2 | length 5.6
  Top Layer w0.125: U6.K2@19.547,7.726 19.547,7.953 19.389,8.112 19.389,9.272 19.616,9.5 v1(20.142,9.5)
  Bottom Layer w0.125: v1(20.142,9.5) 21.107,9.5
  Bottom Layer w0.127: 21.107,9.5 21.808,10.2 22.322,10.2 SB9.1@22.807,10.685
nRF52_P0.26: P6.3 U6.C9 | length 13.8
  Mid Layer 1 w0.125: P6.3@9.25,5.65 8.25,4.65 8.25,3.15 9,2.4 11.677,2.4 12.573,3.296 12.573,4.266 13.138,4.831 14.661,4.831 15.006,5.176 16.706,5.176 16.785,5.255 17.076,5.255 v5(17.097,5.276)
nRF52_P0.27: P6.4 U6.D9 | length 10.1
  Mid Layer 1 w0.125: P6.4@9.25,3.65 10.25,2.65 11.573,2.65 12.323,3.4 12.323,4.369 13.035,5.081 14.557,5.081 14.902,5.426 16.602,5.426 16.778,5.602 17.073,5.602 v5(17.097,5.626)
nRF52_P0.28: P6.5 U6.A6 | length 12.3
  Top Layer w0.125: U6.A6@18.147,4.576 18.147,4.385 18.35,4.182 v1(18.35,4.145)
  Mid Layer 2 w0.125: P6.5@7.25,5.65 8.222,4.678 17.854,4.678 18.35,4.182 v1(18.35,4.145)
nRF52_P0.30: P6.6 U6.A7 | length 12.4
  Top Layer w0.125: U6.A7@17.797,4.576 17.797,4.222 v1(17.875,4.145)
  Mid Layer 2 w0.125: P6.6@7.25,3.65 8.25,2.65 11.573,2.65 13.351,4.428 17.592,4.428 v1(17.875,4.145)
nRF52_P1.00: SB8.1 U6.J3 | length 3.6
  Mid Layer 1 w0.125: v1(19.101,10.262) 18.888,10.048 18.888,7.808 19.197,7.498 v5(19.197,7.376)
  Bottom Layer w0.125: v1@19.099,10.263 19.099,10.406 SB8.1@19.378,10.685
nRF52_P1.01: R50.2 TP41.1 U1.91 U6.J1 U17.B2 | length 23.7
  Top Layer w0.125: v1@15.497,20.952 15.956,21.412 U1.91@15.956,21.597 ; U6.J1@19.897,7.376 19.954,7.376 20.185,7.607 20.185,8.017 20.515,8.348 20.515,8.983 20.853,9.322 v1@22.047,9.322
  Mid Layer 2 w0.125: v1(15.506,20.944) 15.706,20.744 15.706,18.482 16.543,17.645 18.758,17.645 22.483,13.919 22.483,10.749 21.705,9.97 21.705,9.558 22.043,9.22 v1(22.073,9.22)
  Bottom Layer w0.125: v1(15.506,20.944) 15.549,20.987 16.087,20.987 TP41.1@16.2,21.1 16.815,21.715 R50.2@17.275,21.715 17.275,21.003 17.279,20.999 17.279,20.921 U17.B2@17.3,20.9
nRF52_P1.04: TP40.1 U1.92 U6.H1 | length 21.9
  Top Layer w0.125: v1@14.997,20.952 15.456,21.412 U1.92@15.456,21.597 ; U6.H1@19.897,7.026 19.957,7.026 20.435,7.503 20.435,7.914 20.649,8.128 20.765,8.244 20.765,8.827 20.991,9.053 21.538,9.053 22.057,8.534 v1@22.073,8.534
  Mid Layer 2 w0.125: v1(15.006,20.944) 15.006,20.931 15.456,20.481 15.456,18.379 16.44,17.395 18.654,17.395 22.233,13.816 22.233,10.852 21.455,10.074 21.455,9.136 22.057,8.534 v1@22.073,8.534
  other v1: 22.073,8.484
nRF52_P1.05: U6.G2 U12.12 | length 12.2
  Mid Layer 1 w0.125: v1(16.942,12.598) 17.41,13.067 20.792,13.067 21.379,12.48 21.379,11.535 21.024,11.18 21.024,8.131 20.134,7.241 20.134,7.168 20.006,7.039 19.743,6.776 19.739,6.776 19.639,6.676 v5(19.547,6.676)
  Bottom Layer w0.125: v1(16.942,12.598) 16.958,12.614 U12.12@16.958,13.296
nRF52_P1.08: R23.2 TP10.1 U1.19 U6.G9 U9.3 U10.6 U11.A5 U13.3 | length 110.1
  Top Layer w0.125: TP10.1@3,34 3.04,33.96 4.478,33.96 ; v2(4.115,27.838) 4.115,27.892 4.247,28.024 4.247,29.001 4.244,29.004 4.244,31.15 4.478,31.384 4.478,33.96 ; v1(8.052,40.792) 8.211,40.633 8.211,40.21 4.478,36.478 4.478,33.96 ; U1.19@9.836,12.477 v7(9.398,12.477) 9.148,12.227 6.322,12.227 4.653,13.896 4.653,20.93 5.359,21.636 v1(5.359,21.844) 5.402,21.887 5.402,22.052 5.468,22.118 5.468,25.389 6.274,26.195 v2(6.274,26.365) 6.274,26.54 6.502,26.768 12.927,26.768 13.855,25.84 14.291,25.84 v1(14.427,25.977)
  Mid Layer 1 w0.125: v2(4.115,27.838) 4.801,27.838 v2(6.274,26.365) ; v7(9.398,12.477) 9.977,12.477 12.446,10.008 12.446,7.373 13.251,6.568 15.909,6.568 16.017,6.676 v5(17.097,6.676)
  Mid Layer 2 w0.125: 14.229,25.934 14.146,25.85 13.97,25.85 13.776,25.85 ; v3(23.361,32.1) 23.361,30.868 22.69,30.197 20.496,30.197 19.542,29.243 19.542,28.1 18.187,26.745 14.015,26.745 13.633,26.363 13.633,25.993 13.776,25.85 ; v3(38.426,23.55) 38.413,23.55 38.063,23.2 38.063,22.553 37.463,21.953 19.717,21.953 19.354,21.589 15.146,21.589 13.386,23.35 13.386,25.46 13.776,25.85
  Bottom Layer w0.125: v1(5.359,21.844) 5.359,20.703 U13.3@5.504,20.559 ; v1(8.052,40.792) 8.355,40.489 10.658,40.489 11.127,40.02 11.621,39.527 U11.A5@11.621,39.446 ; R23.2@13.493,25.527 13.806,25.84 14.291,25.84 v1(14.427,25.977) ; v3(23.361,32.1) U9.3@23.9,32.1
nRF52_P1.09: R22.2 TP9.1 U1.20 U6.F10 U9.4 U10.5 U11.A4 U13.1 | length 113.1
  Top Layer w0.125: v2@4.486,27.402 4.474,27.391 v2(4.49,27.391) ; v2@4.497,27.391 4.497,30.892 v2(4.607,31) ; v2(4.607,31) 4.728,31.122 4.728,36.374 8.509,40.155 8.509,40.848 8.082,41.275 v1(8.026,41.275) ; U1.20@9.836,11.977 v7(9.398,11.977) 6.219,11.977 4.403,13.793 4.403,21.033 4.902,21.532 v1(4.902,21.692) 4.902,21.905 5.218,22.221 5.218,25.839 6.398,27.018 13.19,27.018 v1(13.995,26.213)
  Mid Layer 1 w0.125: v2(3.581,31.013) v2@4.607,31.013 ; v2(4.49,27.391) 4.894,27.391 5.74,26.545 v2(5.74,26.182) ; v7(9.398,11.977) 10.123,11.977 12.196,9.904 12.196,7.269 13.147,6.318 16.739,6.318 v5(16.747,6.326)
  Mid Layer 2 w0.125: v1(13.995,26.213) 14.122,26.34 14.577,26.34 ; v3(23.361,32.9) 23.784,32.477 23.784,30.937 22.793,29.947 20.599,29.947 19.792,29.14 19.792,27.997 18.291,26.495 14.732,26.495 14.577,26.34 ; v3(38.426,24.05) 38.413,24.05 37.813,23.45 37.813,22.657 37.359,22.203 19.614,22.203 19.251,21.839 15.25,21.839 13.636,23.454 13.636,25.357 13.852,25.573 14.536,25.573 14.79,25.826 14.79,26.127 14.577,26.34
  Bottom Layer w0.125: v1(4.902,21.692) 4.902,21.223 4.591,20.911 4.591,19.107 5.039,18.659 U13.1@5.504,18.659 ; v1(8.026,41.275) 8.082,41.275 8.618,40.739 10.762,40.739 12.021,39.48 U11.A4@12.021,39.446 ; R22.2@13.493,26.162 13.945,26.162 v1(13.995,26.213) ; v3(23.361,32.9) U9.4@23.9,32.9
nRF52_P1.11: TP26.1 U6.A3 | length 7.2
  Top Layer w0.125: U6.A3@19.197,4.576 19.197,4.289 19.3,4.186 v1@19.3,4.17
  Mid Layer 2 w0.125: v3(13.25,5.75) 13.822,5.178 18.304,5.178 19.3,4.182 v1(19.3,4.145)
nRF52_P1.13: SW4.2 U6.A4 | length 14
  Top Layer w0.15: v1(23.825,7.341) 23.986,7.179 SW4.2@24.623,7.179 ; SW4.2@24.623,10.129 24.681,10.129 25.4,9.41 v1(25.4,9.398)
  Mid Layer 1 w0.15: v5(18.847,4.576) 19.399,4.576 19.886,4.089 v1(20.295,4.089)
  Mid Layer 2 w0.15: v1(20.295,4.089) 21.426,5.221 21.426,6.773 21.72,7.067 ; v1(23.825,7.341) 23.771,7.341 23.498,7.067 21.72,7.067 ; v1(25.4,9.398) 24.051,9.398 21.72,7.067
nRF52_RST: SB14.2 TP8.1 U6.K6 U14.6 | length 11.1
  Top Layer w0.125: TP8.1@17.259,10.041 17.496,9.804 17.496,8.689 18.147,8.038 U6.K6@18.147,7.726
  Mid Layer 2 w0.125: v3(15.672,15.215) 15.847,15.389 17.229,15.389 17.584,15.035 17.584,14.714 17.443,14.573 17.443,13.338 17.573,13.208 17.573,12.163 17.297,11.887 17.297,10.49 v1(17.526,10.262)
  Bottom Layer w0.125: SB14.2@15.171,14.986 15.443,14.986 v3(15.672,15.215) 15.906,15.449 U14.6@16.213,15.449
nRF52_SWDCLK: U6.H2 U12.3 | length 13
  Mid Layer 1 w0.125: v1(16.459,12.598) 16.459,12.548 16.771,12.236 17.189,12.236 17.77,12.817 20.689,12.817 21.129,12.377 21.129,11.638 20.774,11.284 20.774,8.235 19.884,7.345 ; v5(19.547,7.026) 19.639,7.026 19.884,7.271 19.884,7.345 ; 19.86,7.301 19.86,7.32 19.884,7.345
  Mid Layer 2 w0.125: v8(15.773,12.319) 16.18,12.319 v1(16.459,12.598)
  Bottom Layer w0.125: v8(15.773,12.319) 16.158,11.935 U12.3@16.158,11.646
nRF52_SWDIO: U6.J2 U12.15 | length 9
  Mid Layer 1 w0.125: v1(18.364,12.421) 18.648,12.421 18.795,12.567 20.585,12.567 20.879,12.273 20.879,11.742 20.524,11.387 20.524,8.338 19.562,7.376 v5(19.547,7.376)
  Bottom Layer w0.125: U12.15@17.583,12.271 17.986,12.271 18.136,12.421 v1(18.364,12.421)
nRF91_RST: R8.1 U14.4 | length 5.9
  Top Layer w0.125: R8.1@16.109,10.084 16.287,10.261 v1(16.287,10.77)
  Mid Layer 2 w0.125: v1(16.287,10.77) 16.287,11.23 17.323,12.266 17.323,13.104 17.193,13.234 17.193,14.856 v3(17.221,14.884)
  Bottom Layer w0.125: U14.4@17.213,15.449 17.221,15.441 v3(17.221,14.884)